# Altium PCB ublox_gnss_node.PcbDoc (part 4 of 5)
Units mm, origin at the board's own origin, x right, y up, seen from the top; angles counter-clockwise.
Board outline 84 x 108.04 mm, 6 copper layers (Top Layer (HSig), L2 GND, L3 Signal X, L4 PWR, L5 GND, Bottom Layer (Y)), stack 1.538 mm thick; 222 components, 159 nets, 892 pads, 1025 vias.
Unrouted connection lines stored in the file: 345.
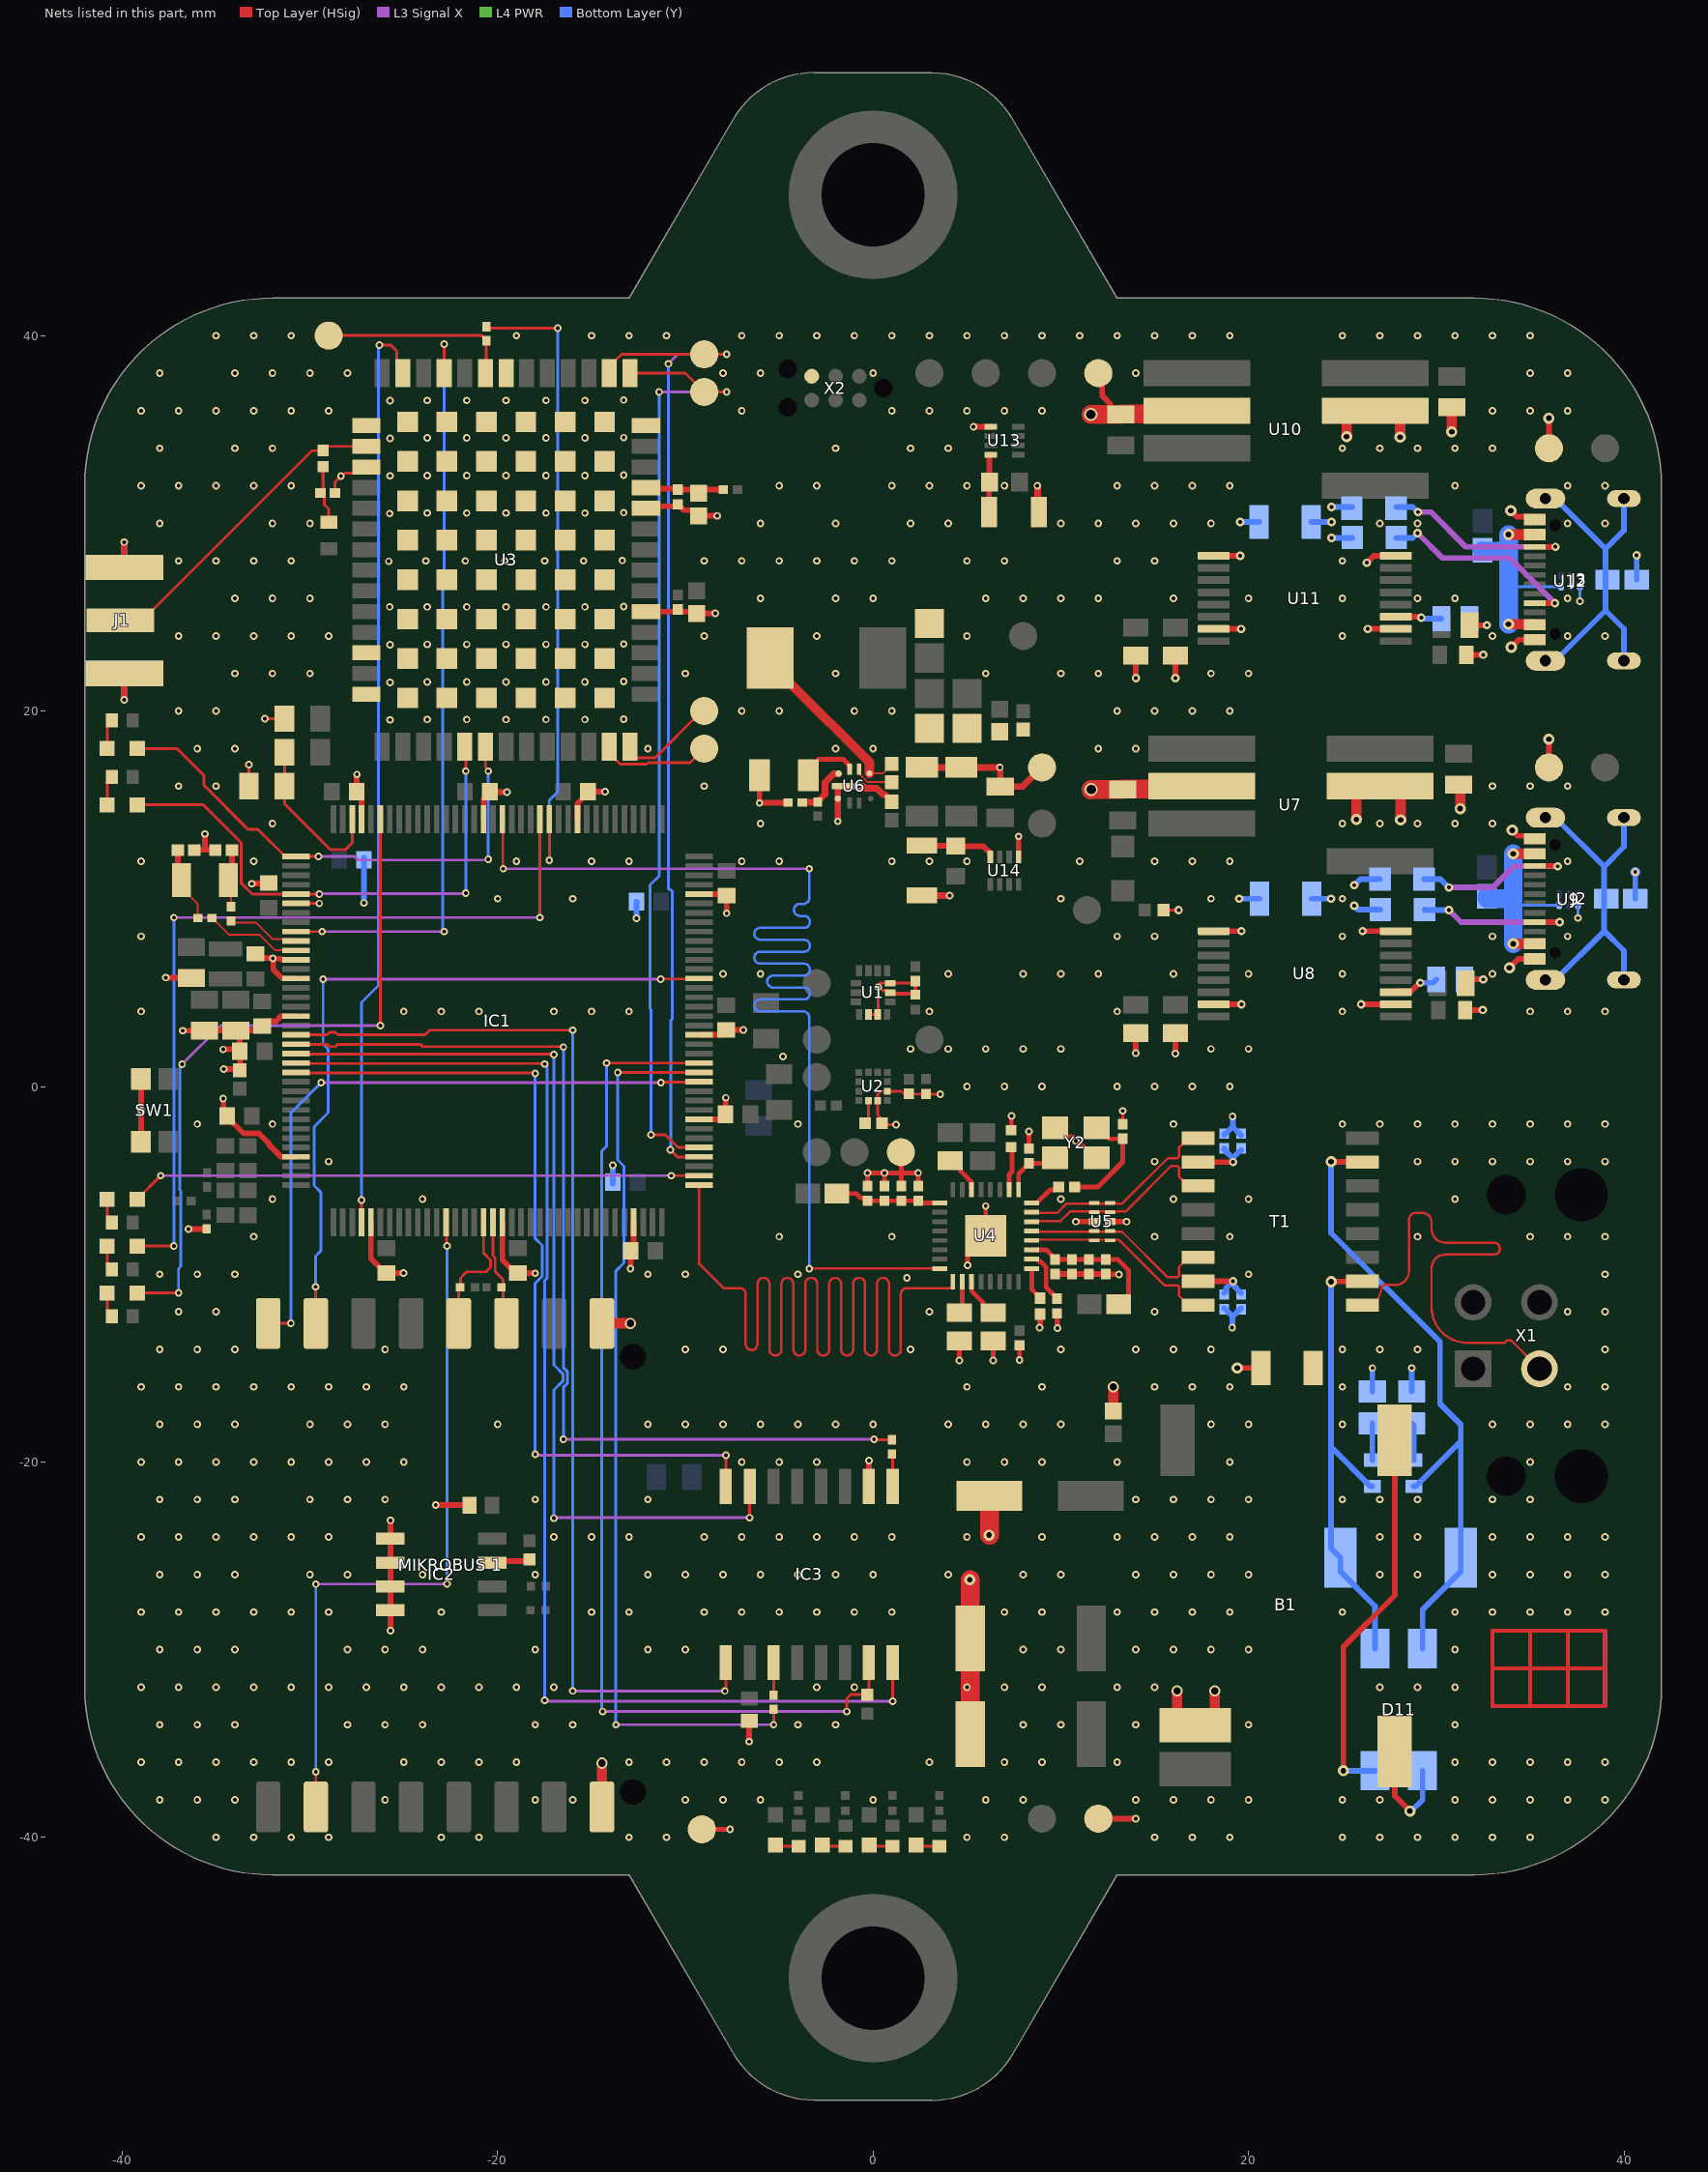
[diagram p7: the nets of this part, all layers, seen from the top]

## Via types
v1: diameter 0.4, hole 0.2, Top Layer (HSig) to Bottom Layer (Y), tented both sides, 916 vias
v2: diameter 0.45, hole 0.2, Top Layer (HSig) to Bottom Layer (Y), tented both sides, 53 vias
v3: diameter 0.6, hole 0.3, Top Layer (HSig) to Bottom Layer (Y), tented both sides, 35 vias
v4: diameter 0.7, hole 0.5, Top Layer (HSig) to Bottom Layer (Y), tented both sides, 13 vias
v5: diameter 0.6, hole 0.4, Top Layer (HSig) to Bottom Layer (Y), tented both sides, 8 vias

## Nets (pads, with @x,y where several pads share a name; then routed paths per layer and width w, separated by ;. In a path a pad name is that pad's centre, name@x,y a point inside that pad or via, vN(x,y) a via of type N, cw(c..) or ccw(c..) an arc to the next point about the centre after c; other vN are vias at no path point) (continued)
ETH_TXD0: IC1.126 U4.24 | length 68.4
  Top Layer (HSig) w0.128: IC1.126@-19.75,14.238 -19.725,14.213 -19.725,11.625 v1(-19.699,11.599) ; v1(-3.399,-9.701) U4.24@3.548,-9.701
  L3 Signal X w0.117: v1(-19.699,11.599) v1(-3.399,11.599)
  Bottom Layer (Y) w0.128: v1(-3.399,-9.701) -3.399,3.617 -3.399,3.681 ccw(c-3.718,3.681) -3.718,3.999 -6.009,3.999 cw(c-6.009,4.317) -6.009,4.635 -3.68,4.635 ccw(c-3.68,4.954) -3.68,5.272 -5.318,5.272 cw(c-5.318,5.59) -5.318,5.908 -3.68,5.908 ccw(c-3.68,6.226) -3.68,6.544 -6.009,6.544 cw(c-6.009,6.862) -6.009,7.18 -3.68,7.18 ccw(c-3.68,7.498) -3.68,7.816 -6.009,7.816 cw(c-6.009,8.134) -6.009,8.452 -3.68,8.452 ccw(c-3.68,8.77) -3.68,9.088 -3.898,9.088 cw(c-3.898,9.406) -3.898,9.724 -3.718,9.724 ccw(c-3.718,10.042) -3.399,10.042 -3.399,11.071 v1(-3.399,11.599)
ETH_TXD1: IC1.73 U4.25 | length 70.9
  Top Layer (HSig) w0.128: IC1.73@-9.262,-5.25 -9.262,-9.45 -7.969,-10.744 -7.609,-10.744 -7.109,-10.744 cw(c-7.109,-11.062) -6.791,-11.062 -6.791,-13.722 ccw(c-6.473,-13.722) -6.154,-13.722 -6.154,-10.513 cw(c-5.836,-10.513) -5.518,-10.513 -5.518,-14.012 ccw(c-5.2,-14.012) -4.882,-14.012 -4.882,-10.513 cw(c-4.564,-10.513) -4.246,-10.513 -4.246,-14.012 ccw(c-3.928,-14.012) -3.61,-14.012 -3.61,-10.513 cw(c-3.292,-10.513) -2.974,-10.513 -2.974,-14.012 ccw(c-2.656,-14.012) -2.338,-14.012 -2.338,-10.513 cw(c-2.02,-10.513) -1.702,-10.513 -1.702,-14.012 ccw(c-1.384,-14.012) -1.066,-14.012 -1.066,-10.513 cw(c-0.748,-10.513) -0.43,-10.513 -0.43,-14.012 ccw(c-0.112,-14.012) 0.206,-14.012 0.206,-10.513 cw(c0.525,-10.513) 0.843,-10.513 0.843,-14.012 ccw(c1.161,-14.012) 1.479,-14.012 1.479,-11.062 cw(c1.797,-11.062) 1.797,-10.744 1.861,-10.744 4.186,-10.744 4.186,-10.725 4.248,-10.662 U4.25@4.248,-10.401
GEOFENCE_STAT: D4.1 IC1.5 U3.19 | length 28.6
  Top Layer (HSig) w0.15: D4.1@-39.2,15 -35.673,15 -33.655,12.982 -33.655,10.825 -33.075,10.245 -30.743,10.245 IC1.5@-30.738,10.25 v1(-29.5,10.25) ; U3.19@-21.75,18.1 -21.7,18.05 v1(-21.7,16.8)
  L3 Signal X w0.15: v1(-29.5,10.25) -29.475,10.275 -21.725,10.275 v1(-21.7,10.3)
  Bottom Layer (Y) w0.15: v1(-21.7,10.3) v1(-21.7,16.8)
GND: "MIKROBUS 1.8" "MIKROBUS 1.9" *14.1 *15.1 *16.1 *17.1 *18.1 B1.2 C1.1 C2.1 C3.1 C4.1 C5.1 C7.1 C8.1 C9.1 C14.1 C15.1 C16.1 C17.1 C18.1 C19.1 C20.1 C21.1 C22.1 C23.1 C24.1 C25.1 C26.2 C27.1 C28.1 C29.1 C30.1 C31.1 C32.1 C33.1 C34.2 C35.2 C36.1 C37.1 C38.1 C39.1 C40.1 C41.1 C42.1 C43.1 C44.1 C45.1 C46.1 C47.1 C48.1 C49.1 C50.1 C53.1 C54.1 C56.1 C57.1 C58.1 C59.2 C60.1 C61.1 C62.1 C63.1 C64.1 C65.1 C67.1 C71.2 C72.2 C73.1 C75.1 C79.2 C80.2 C81.1 C82.2 C83.2 C84.2 C85.1 C86.1 C87.1 C88.1 IC1.6 IC1.12 IC1.14 IC1.18 IC1.33 IC1.41 IC1.55 IC1.69 IC1.80 IC1.89 IC1.104 IC1.118 IC1.128 IC1.141 IC2.1 IC2.2 IC2.3 IC2.4 IC3.10 J1.2 J1.3 J1.4 J1.5 R14.2 R15.2 R18.1 R29.1 R30.1 R33.1 R34.1 R39.1 R41.1 R52.1 R53.1 R56.2 R57.2 SW1.2 SW1.4 U1.2 U1.3 U1.6 U1.7 U2.6 U2.8 U3.1 U3.3 U3.12 U3.14 U3.32 U3.37 U3.41 U3.48 U3.55 U4.33 U5.3 U5.8 U6.1 U6.9 U7.6 U8.9 U8.15 U10.6 U11.9 U11.15 U13.1 U14.1 X2.5 Y2.2 Y2.4 | length 207.1
  Top Layer (HSig) w0.15: R14.2@-33.25,16 v1(-33.25,17.15) ; v1(-32.4,19.6) R15.2@-31.35,19.6 ; IC1.6@-30.738,9.75 v1(-29.5,9.75) ; U1.2@-0.25,3.838 U1.3@0.25,3.838 0.262,3.85 0.262,5.177 0.272,5.186 0.275,5.186 v1@0.169,5.292 ; C5.1@0.483,-1.956 C5.1@0.485,-1.956 ; U1.6@0.913,5 0.813,5.1 0.535,5.1 0.343,5.292 v1@0.169,5.292 ; U1.7@0.917,5.505 U1.7@0.913,5.5 ; v1(1.219,-2.032) 0.72,-2.032 0.485,-1.797 0.485,-1.75 0.25,-1.515 U2.6@0.25,-0.763 0.25,-0.425 0.425,-0.25 U2.8@0.763,-0.25 1.51,-0.25 1.66,-0.4 2.5,-0.4 2.506,-0.406 v1(3.581,-0.406) ; C2.1@2.435,5.425 C2.1@2.25,5.61 2.14,5.5 U1.7@0.913,5.5 ; C48.1@13.3,-2.01 v1(13.3,-1.3) ; R41.1@15.4,9.4 v2(16.275,9.4) ; v1@0.169,5.292 0.376,5.5 U1.7@0.913,5.5
  Top Layer (HSig) w0.155: C7.1@-28.66,31.625 -28.66,32.215 v1(-28.35,32.525) -28.284,32.525 -28.131,32.677 -27.323,32.677 U3.3@-27,33
  Top Layer (HSig) w0.2: U1.6@0.913,5 0.962,4.95 2.2,4.95 C1.1@2.25,4.9 C2.1@2.25,5.61
  Top Layer (HSig) w0.25: -14.309,-38.519 -14.448,-38.38 -14.448,-38.963 -13.924,-39.487 ; *17.1@-8.864,-39.573 v1(-7.619,-39.573) ; C43.1@-0.3,-5.31 v1(-0.3,-4.6) v1(0.6,-4.6) ; C42.1@0.6,-5.31 v1(0.6,-4.6) ; C41.1@1.5,-5.31 1.5,-4.6 ; *14.1@1.5,-3.5 1.5,-4.6 ; C40.1@2.4,-5.31 v1(2.4,-4.6) 1.5,-4.6 ; v1(4.6,-14.6) R29.1@4.6,-13.55 ; v1(5.03,-9.53) 5.03,-8.919 U4.33@5.999,-7.95 5.996,-7.948 v1(5.996,-6.369) ; v1(6.4,-14.6) R30.1@6.4,-13.55 ; R34.1@7.35,-2.325 7.362,-2.313 7.362,-1.588 v1(7.375,-1.575) ; v1(7.8,-14.575) C53.1@7.8,-13.79 ; C49.1@8.3,-3.31 v1(8.3,-2.4) ; Y2.2@9.7,-2.2 10.175,-2.675 10.675,-2.675 10.675,-2.734 10.8,-2.859 v1(10.8,-2.9) ; v1@10.9,-2.9 11.8,-3.8 Y2.4@11.9,-3.8 ; v1(0.6,-4.6) 1.5,-4.6
  Top Layer (HSig) w0.3: v1(-39.9,20.6) J1.3@-39.9,22 ; J1.2@-39.9,27.65 v1(-39.9,29) ; SW1.4@-39,-2.95 SW1.2@-39,0.4 ; v1(-37.675,5.8) C27.1@-36.305,5.8 ; v1(-36.775,2.975) -35.58,2.975 -35.575,2.98 C33.1@-33.95,2.98 ; v1(-36.475,-7.6) -36.463,-7.588 -35.512,-7.588 R18.1@-35.5,-7.575 ; C35.2@-36.16,12.6 -35.6,12.6 ; v1(-35.6,13.45) -35.6,12.6 ; C34.2@-35.04,12.6 -35.6,12.6 ; v1(-34.625,-0.65) -34.606,-0.669 -34.606,-1.379 C23.1@-34.41,-1.575 ; v1(-34.625,1.975) C24.1@-33.735,1.975 ; v1(-34.592,0.926) C31.1@-33.727,0.926 ; C23.1@-34.41,-1.63 -33.54,-2.5 -32.726,-2.5 -32.186,-3.041 -32.186,-3.109 -31.545,-3.75 IC1.33@-30.738,-3.75 ; C31.1@-33.7,0.965 -33.718,0.982 -33.718,1.957 C24.1@-33.735,1.975 ; v1(-33.1,10.8) -33.082,10.818 -32.217,10.818 C14.1@-32.2,10.835 ; C26.2@-32.9,7.07 -32.674,6.844 -31.994,6.844 v1(-31.975,6.825) v1@-31.956,6.806 ; C25.1@-32.45,3.215 -32.45,3.285 -32.255,3.48 -31.815,3.48 -31.545,3.75 IC1.18@-30.738,3.75 ; C25.1@-32.345,2.98 C33.1@-33.95,2.98 ; IC1.14@-30.738,5.75 -31.479,5.75 -31.956,6.227 v1@-31.956,6.806 ; IC1.12@-30.738,6.75 -31.479,6.75 -31.535,6.806 v1@-31.956,6.806 ; v1(-27.5,16.625) -27.507,16.618 -27.507,15.707 C86.1@-27.515,15.7 -27.25,15.435 IC1.141@-27.25,14.238 ; IC1.41@-26.75,-7.238 -26.75,-9.165 -25.98,-9.935 C22.1@-25.925,-9.935 v1(-25.01,-9.935) ; v1(-25.712,-28.988) IC2.4@-25.712,-27.905 IC2.3@-25.712,-26.635 IC2.2@-25.712,-25.365 IC2.1@-25.712,-24.095 v1(-25.712,-23.112) ; v1(-23.3,-22.3) C82.2@-21.5,-22.3 ; IC1.128@-20.75,14.238 -20.75,15.31 -20.49,15.57 -20.49,15.7 -20.465,15.675 v1(-19.5,15.675) ; IC1.55@-19.75,-7.238 -19.75,-9.24 -19.005,-9.985 C21.1@-18.95,-9.985 ; C21.1@-18.925,-9.935 -18.918,-9.942 -18.008,-9.942 v1(-18,-9.95) ; IC1.118@-15.75,14.238 -15.75,15.085 -15.19,15.645 C17.1@-15.19,15.7 v1(-14.275,15.7) ; v1(-12.925,-9.7) -12.918,-9.693 -12.918,-8.757 -12.75,-8.59 IC1.69@-12.75,-7.238 ; U3.32@-12.1,25.3 -9.501,25.3 C8.1@-9.4,25.199 v1(-8.4,25.2) ; U3.37@-12.1,30.8 -11.995,30.905 -10.505,30.905 C88.1@-10.4,31.01 -10.4,30.99 -10.29,30.88 -10.27,30.88 -10.092,30.702 -9.603,30.702 C63.1@-9.3,30.399 v1(-8.301,30.399) ; IC1.80@-9.262,-1.75 -8.235,-1.75 -8.23,-1.745 -8.175,-1.745 -7.91,-1.48 -7.91,-1.425 -7.854,-1.369 -7.854,-0.606 v1(-7.848,-0.6) ; IC1.89@-9.262,2.75 -8.075,2.75 C19.1@-7.825,3 ; IC1.104@-9.262,10.25 -7.885,10.25 C18.1@-7.8,10.165 v1(-7.8,9.225) ; C19.1@-7.825,3.015 v1(-6.915,3.015) ; v1(-6.6,-34.9) C83.2@-6.6,-33.8 ; C65.1@-6.05,16.575 v1(-6.05,15.1) -6.038,15.112 -4.537,15.112 R39.1@-4.525,15.125 ; IC3.10@-0.225,-21.31 v1(-0.225,-19.925) ; v1(5.35,35.15) U13.1@6.26,35.15 ; U14.1@7.75,12.24 v1(7.75,13.325) ; v1(8.875,-12.85) 8.887,-12.838 8.887,-12.138 R33.1@8.9,-12.125 ; C36.1@9.7,-9.99 C37.1@10.6,-9.99 C38.1@11.5,-9.99 C39.1@12.4,-9.99 12.413,-10.003 13.087,-10.003 v1(13.1,-10.017) ; C50.1@9.8,-12.09 9.813,-12.102 9.813,-12.863 v1(9.825,-12.875) ; v1(10.8,-7.2) U5.3@11.782,-7.2 ; *16.1@12,-39 v1(14,-39) ; *18.1@12,38 12.2,37.8 12.2,36.8 12.63,36.37 12.63,36.13 12.96,35.8 C75.1@13.2,35.8 ; U5.8@12.617,-7.2 v1(13.5,-7.2) ; v1(14,1.775) C72.2@14,2.85 ; v2(14,21.75) C80.2@14,22.95 ; v1(16.1,1.75) C71.2@16.1,2.85 ; v2(16.1,21.75) C79.2@16.1,22.95 ; B1.2@16.16,-34.035 16.84,-34.035 16.94,-34.035 B1.2@17.15,-34.035 ; U8.15@18.15,4.375 v2(19.625,4.375) ; U8.9@18.15,8.275 v2(19.625,8.275) ; U11.15@18.15,24.375 v2(19.6,24.375) v2@19.625,24.375 ; U11.9@18.15,28.275 v2(19.55,28.275) ; v3(19.4,-15) C54.1@20.66,-15 ; C33.1@-33.95,2.98 -33.735,2.765 C24.1@-33.735,1.975
  Top Layer (HSig) w0.35: R39.1@-4.575,15.075 R39.1@-4.537,15.112 ; v1(-1.877,14.123) U6.1@-1.877,15.339 -1.877,16 U6.9@-1.55,16 v1(-0.734,16) -0.725,15.99 -0.531,15.99 -0.426,15.885 0.196,15.885 0.526,15.555 0.63,15.555 1,15.185 C59.2@1,15.165 ; C58.1@2.41,17.19 C58.1@2.6,17 v1(6.75,17) ; R57.2@2.6,10.175 v1(4.075,10.175) ; v1@6.75,17.014 v1(6.75,17) ; C64.1@7.95,19.06 C64.1@8,19.01 ; v1(8.75,32) 8.76,31.99 8.76,30.665 R56.2@8.825,30.6 ; *15.1@9,17 7.98,15.98 C56.1@6.775,15.98 6.775,16.961 6.75,16.986 v1(6.75,17)
  Top Layer (HSig) w0.55: -14.448,-38.38 v5(-14.448,-36.048) ; -14.448,-12.62 v5(-12.92,-12.62) ; C85.1@12.8,-17.299 v5(12.8,-16) ; v5(16.2,-32.2) 16.2,-33.395 B1.2@16.84,-34.035 ; B1.2@16.3,-33.395 B1.2@16.94,-34.035 ; B1.2@17.15,-34.035 17.56,-34.035 18.2,-33.395 v5(18.2,-32.2)
  Top Layer (HSig) w1: R53.1@5.175,-34.5 R52.1@5.175,-29.4 v3@5.175,-26.275 ; v3@6.2,-23.9 C84.2@6.2,-21.8 ; v4@11.6,15.8 v4(11.62,15.82) C67.1@13.3,15.82 13.32,15.84 17.34,15.84 U7.6@17.5,16 ; v4(11.6,35.8) C75.1@12.96,35.8 ; C75.1@13.2,35.8 13.22,35.82 17.07,35.82 U10.6@17.25,36
  Bottom Layer (Y) w0.3: v1(-39.9,20.6) J1.5@-39.9,22 ; J1.4@-39.9,27.65 v1(-39.9,29) ; v1(-27.125,9.775) -27.12,9.78 -27.12,12.17 C28.1@-27.115,12.175 ; C30.1@-13.86,-5.175 v1(-13.86,-4.19) ; v1(-12.61,8.96) C29.1@-12.61,9.85 ; C46.1@18.7,-11.835 C46.1@18.7,-11.815 ; C46.1@18.7,-11.81 19.15,-12.26 ; C44.1@18.7,-2.59 19.15,-2.14 ; C44.1@18.7,-2.56 C44.1@18.7,-2.54 ; v1(19.125,-12.85) 19.144,-12.831 19.144,-12.266 C47.1@19.6,-11.81 ; v1(19.15,-1.6) 19.169,-1.619 19.169,-2.159 19.6,-2.59 C45.1@19.6,-2.61 ; v2(19.5,10) C73.1@20.585,10 ; v2(19.55,30.075) C81.1@20.56,30.075
  other v1: -35,-40 -33,-40 -31,-40 -29,-40 -23,-40 -21,-40 -13,-40 -11,-40 5,-40 7,-40 15,-40 17,-40 19,-40 -38,-38 -36,-38 -34,-38 -26,-38 -18,-38 -16,-38 -10,-38 -8,-38 -6,-38 0,-38 6,-38 8,-38 14,-38 16,-38 18,-38 20,-38 -39,-36 -37,-36 -35,-36 -33,-36 -31,-36 -29,-36 -25,-36 -23,-36 -21,-36 -19,-36 -13,-36 -11,-36 -9,-36 -7,-36 -5,-36 -3,-36 3,-36 7,-36 9,-36 13,-36 -38,-34 -36,-34 -34,-34 -28,-34 -26,-34 -24,-34 -18,-34 -16,-34 -4,-34 -2,-34 8,-34 10,-34 14,-34 20,-34 -39,-32 -37,-32 -35,-32 -33,-32 -31,-32 -29,-32 -27,-32 -25,-32 -23,-32 -21,-32 -19,-32 -17,-32 -3,-32 -1,-32 5,-32 7,-32 9,-32 13,-32 15,-32 -38,-30 -36,-30 -34,-30 -28,-30 -26,-30 -24,-30 -18,-30 -12,-30 -10,-30 8,-30 10,-30 14,-30 16,-30 18,-30 20,-30 -39,-28 -37,-28 -35,-28 -33,-28 -31,-28 -29,-28 -23,-28 -15,-28 -13,-28 -9,-28 -7,-28 -5,-28 -3,-28 -1,-28 1,-28 7,-28 9,-28 13,-28 15,-28 17,-28 19,-28 -38,-26 -36,-26 -34,-26 -30,-26 -28,-26 -24,-26 -18,-26 -12,-26 -10,-26 -8,-26 -6,-26 -4,-26 -2,-26 0,-26 4,-26 8,-26 10,-26 14,-26 16,-26 18,-26 20,-26 -39,-24 -37,-24 -35,-24 -33,-24 -31,-24 -29,-24 -17,-24 -15,-24 -13,-24 -9,-24 -7,-24 -5,-24 -3,-24 -1,-24 1,-24 5,-24 9,-24 13,-24 15,-24 17,-24 19,-24 -38,-22 -36,-22 -34,-22 -30,-22 -28,-22 -26,-22 -18,-22 -12,-22 14,-22 16,-22 18,-22 20,-22 -39,-20 -37,-20 -35,-20 -33,-20 -31,-20 -29,-20 -27,-20 -25,-20 -7,-20 -5,-20 -3,-20 5,-20 7,-20 9,-20 13,-20 19,-20 -38,-18 -36,-18 -34,-18 -30,-18 -28,-18 -26,-18 -20,-18 -12,-18 -10,-18 -8,-18 -6,-18 -4,-18 -2,-18 0,-18 4,-18 6,-18 8,-18 10,-18 18,-18 20,-18 -39,-16 -37,-16 -35,-16 -33,-16 -31,-16 -29,-16 -27,-16 -25,-16 5,-16 9,-16 15,-16 17,-16 19,-16 -38,-14 -36,-14 -34,-14 -26,-14 -10,-14 -8,-14 2,-14 10,-14 14,-14 16,-14 18,-14 -37,-12 -35,-12 3,-12 15,-12 1.8,-10.2 -38,-10 -36,-10 -34,-10 -12,-10 -10,-10 -4,-10 20,-10 -33,-8 -5,-8 1,-8 15,-8 19,-8 -32,-6 -24,-6 10,-6 16,-6 20,-6 -29,-4 15,-4 -36,-2 -32,-2 -4,-2 16,-2 -39,-1.275 5,0 7,0 9,0 13,0 15,0 17,0 19,0 -4.8,1.6 2,2 4,2 6,2 8,2 10,2 18,2 20,2 -39,4 -25,4 -23,4 -21,4 -17,4 -15,4 -13,4 3,4 13,4 0.275,5.292 -8,6 -6,6 4,6 8,6 10,6 12,6 16,6 20,6 -39,8 13,8 15,8 -20,10 -16,10 10,10 18,10 -39,12 -33,12 -19,12 -15,12 -13,12 -7,12 -5,12 1,12 3,12 5,12 11,12 15,12 17,12 19,12 -32,14 -6,14 -37,16 -35,16 -9,16 -36,18 -34,18 -12,18 -2,18 0,18 12,18 14,18 -25.729,19.53 -23.75,19.55 -21.65,19.55 -19.55,19.55 -17.425,19.55 -15.35,19.55 -13.286,19.57 -37,20 -35,20 -7,20 -5,20 -1,20 1,20 13,20 15,20 17,20 19,20 -25.729,21.53 -23.75,21.55 -21.65,21.55 -19.55,21.55 -17.425,21.55 -15.35,21.55 -13.286,21.57 -34,22 -32,22 -30,22 -10,22 -2,22 6,22 10,22 12,22 18,22 20,22 -25.729,23.53 -23.75,23.55 -21.65,23.55 -19.55,23.55 -17.425,23.55 -15.35,23.55 -13.286,23.57 -37,24 -35,24 -33,24 -31,24 -29,24 -9,24 -3,24 5,24 -25.75,25.55 -23.75,25.55 -21.65,25.55 -19.55,25.55 -17.425,25.55 -15.35,25.55 -13.286,25.57 -34,26 -32,26 -30,26 -6,26 -2,26 0,26 6,26 8,26 10,26 12,26 16,26 20,26 -25.804,27.98 -37,28 -35,28 -33,28 -31,28 -23.825,28 -21.725,28 -19.625,28 -17.5,28 -15.425,28 -13.361,28.02 -9,28 -7,28 -5,28 -3,28 -1,28 1,28 5,28 7,28 13,28 15,28 -38,30 -32,30 -30,30 -6,30 -2,30 2,30 4,30 10,30 12,30 14,30 16,30 18,30 -25.75,30.525 -23.75,30.55 -21.65,30.55 -19.55,30.55 -17.425,30.55 -15.35,30.55 -13.286,30.57 -39,32 -37,32 -35,32 -33,32 -31,32 -5,32 -3,32 1,32 3,32 5,32 7,32 13,32 15,32 17,32 19,32 -25.729,32.53 -23.75,32.55 -21.65,32.55 -19.55,32.55 -17.425,32.55 -15.35,32.55 -13.286,32.57 -38,34 -34,34 -32,34 -2,34 2,34 4,34 -25.729,34.53 -23.75,34.55 -21.65,34.55 -19.55,34.55 -17.425,34.55 -15.35,34.55 -13.286,34.57 -39,36 -37,36 -35,36 -33,36 -31,36 -29,36 -7,36 1,36 3,36 5,36 7,36 9,36 -25.729,36.53 -23.75,36.55 -21.65,36.55 -19.55,36.55 -17.425,36.55 -15.35,36.55 -13.286,36.57 -38,38 -34,38 -32,38 -30,38 -28,38 -8,38 -6,38 0,38 14,38 -35,40 -33,40 -31,40 -19,40 -15,40 -13,40 -11,40 -7,40 -5,40 -3,40 -1,40 1,40 3,40 5,40 7,40 9,40 11,40 13,40 15,40 17,40 19,40
  other v3: 5.15,-26.275 6.175,-23.9
GND_BP: *21.1 C66.1 C68.1 C69.2 C70.2 C73.2 FB4.2 J2.A1_B12 J2.B1_A12 R42.1 R43.1 U7.2 U8.2 U8.8 U9.4 | length 24
  Top Layer (HSig) w0.3: v2(26,4.375) U8.2@27.85,4.375 ; v2(26.075,8.275) U8.8@27.85,8.275 ; C68.1@31.46,4.075 v2(32.475,4.075) ; C69.2@31.575,5.5 31.775,5.7 v2(32.5,5.7) ; v3(33.9,6.325) 34.375,6.8 J2.A1_B12@35.25,6.8 ; v3(34.05,13.65) 34.35,13.35 35.1,13.35 J2.B1_A12@35.25,13.2 ; *21.1@36,17 v3(36,18.5)
  Top Layer (HSig) w0.55: v3(25.75,14.225) 25.75,15.577 26.173,16 U7.2@27,16 27.677,16 28.1,15.577 v3(28.1,14.2) ; v3(31.275,14.8) C66.1@31.275,16.105
  Bottom Layer (Y) w0.15: v2(32.5,5.7) v2@32.5,5.781 ; v1(37.55,8.975) U9.4@37.55,9.65
  Bottom Layer (Y) w0.3: C73.2@23.365,10 v2(24.4,10) ; v2(25.625,9.625) 25.825,9.425 R42.1@27.025,9.425 ; v2(25.625,10.725) 25.95,11.05 R43.1@27,11.05 ; C70.2@31.5,5.7 v2(32.5,5.7) ; FB4.2@40.601,10 v2(40.6,11.425)
  Bottom Layer (Y) w0.55: v2(40.6,11.425) v2(40.6,11.425)
  other v1: 25,4 35,4 37,4 39,4 25,6 33,6 25,8 33,8 37,8 25,10 37,12 25,14 27,14 29,14 31,14 33,14 33,16 35,16 37,16
GND_BP2: *24.1 C74.1 C76.1 C77.2 C78.2 C81.2 FB6.2 J3.A1_B12 J3.B1_A12 R46.1 R47.1 U10.2 U11.2 U11.8 U12.4 | length 19.9
  Top Layer (HSig) w0.3: v2(26.3,27.9) 26.675,28.275 U11.8@27.85,28.275 ; v2(26.35,24.375) U11.2@27.85,24.375 ; C76.1@31.61,23 v2(32.5,23) ; C77.2@31.775,24.575 v2(32.7,24.575) ; v3(33.975,30.675) 34.3,30.35 35.1,30.35 J3.B1_A12@35.25,30.2 ; v3(34,23.4) 34.4,23.8 J3.A1_B12@35.25,23.8 ; *24.1@36,34 v3(36,35.6)
  Top Layer (HSig) w0.55: v3(25.225,34.62) U10.2@25.225,35.925 ; v3(28.075,34.595) U10.2@28.075,35.9 ; v3(30.825,34.875) C74.1@30.825,36.18
  Bottom Layer (Y) w0.15: v1(37.65,25.85) U12.4@37.65,26.625
  Bottom Layer (Y) w0.3: C81.2@23.34,30.075 v2(24.425,30.075) ; v2(24.425,29.225) R46.1@25.525,29.225 ; v2(24.425,30.875) R47.1@25.525,30.875 ; C78.2@31.775,24.925 31.775,24.9 32.1,24.575 v2(32.7,24.575) ; FB6.2@40.676,27 v2@40.676,28.301
  other v1: 25,24 33,24 37,24 39,24 25,26 29,26 31,26 37,26 25,28 27,30 29,30 37,30 39,30 31,32 37,32 39,32 25,34 27,34 29,34 31,34 33,34 33,36 35,36 37,36 35,38 37,38 25,40 27,40 29,40 31,40 33,40 35,40
  other v2: 40.674,28.301
GND_ETH: C54.2 R36.1 R37.1 | length 2.5
  Bottom Layer (Y) w0.3: R36.1@26.6,-16.25 v1(26.6,-15) ; R37.1@28.7,-16.25 v1(28.7,-15)
  other v1: 25,-40 27,-40 29,-40 31,-40 33,-40 35,-40 25,-38 27,-38 31,-38 33,-38 35,-38 37,-38 39,-38 31,-36 33,-36 35,-36 37,-36 39,-36 31,-34 27,-32 29,-32 31,-32 31,-30 25,-28 31,-28 33,-28 35,-28 37,-28 39,-28 27,-26 29,-26 33,-26 35,-26 37,-26 39,-26 27,-24 29,-24 33,-24 35,-24 37,-24 39,-24 25,-22 27,-22 29,-22 33,-22 35,-22 35,-20 25,-18 33,-18 35,-18 37,-18 39,-18 25,-16 37,-16 39,-16 25,-14 27,-14 29,-14 39,-14 37,-12 39,-12 39,-10 29,-8 35,-8 37,-8 39,-8 31,-6 29,-4 31,-4 33,-4 35,-4 37,-4 39,-4 25,-2 27,-2 29,-2 31,-2 33,-2 35,-2 37,-2 39,-2
GNSS_EXTINT: IC1.9 U3.51 | length 40.7
  Top Layer (HSig) w0.15: IC1.9@-30.738,8.25 v1(-29.35,8.25) ; U3.51@-22.85,38 v1(-22.85,39.55)
  L3 Signal X w0.15: v1(-29.35,8.25) v1(-22.85,8.25)
  Bottom Layer (Y) w0.15: -22.925,27.476 -22.925,8.393 -22.85,8.318 v1(-22.85,8.25) ; -22.85,27.551 v1(-22.85,39.55)
GNSS_RESET_N: IC1.121 R2.1 | length 34.6
  Top Layer (HSig) w0.15: R2.1@-20.6,40.475 -20.525,40.4 v1(-16.8,40.4) ; v1(-17.25,12.05) IC1.121@-17.25,14.238
  Bottom Layer (Y) w0.15: v1(-17.25,12.05) -17.25,15.245 -16.8,15.695 v1(-16.8,40.4)
GNSS_RTK_STAT: D2.1 IC1.1 U3.20 | length 27.5
  Top Layer (HSig) w0.15: D2.1@-39.2,18 -37.076,18 -35.638,16.562 -35.638,16.038 -33.288,13.688 -32.763,13.688 -31.326,12.25 IC1.1@-30.738,12.25 v1(-29.55,12.25) ; U3.20@-20.65,18.1 -20.65,17.018 -20.5,16.868 v1(-20.5,16.8)
  L3 Signal X w0.15: v1(-29.55,12.25) -27.626,12.25 -27.439,12.062 -20.538,12.062 v1(-20.5,12.1)
  Bottom Layer (Y) w0.15: v1(-20.5,12.1) v1(-20.5,16.8)
GNSS_TIMEPULSE: IC1.40 U3.53 | length 49.5
  Top Layer (HSig) w0.15: IC1.40@-27.25,-7.238 v1(-27.25,-6.05) ; v1(-26.3,39.5) -25.7,39.5 -25.375,39.175 -25.375,38.325 U3.53@-25.05,38
  Bottom Layer (Y) w0.15: v1(-27.25,-6.05) -27.25,4.486 -26.35,5.386 -26.35,39.45 v1(-26.3,39.5)
GNSS_UART1_RX: *10.1 IC1.76 U3.43 | length 53.9
  Top Layer (HSig) w0.15: U3.43@-14.05,38 -14.05,38.35 -13.4,39 *10.1@-9,39 v1(-7.8,39) ; v1(-10.8,-3.375) -10.425,-3.75 IC1.76@-9.262,-3.75
  L3 Signal X w0.15: v1(-10.9,38.5) -10.4,39 v1(-7.8,39)
  Bottom Layer (Y) w0.15: v1(-10.9,38.5) -10.9,10.495 -10.803,10.495 -10.7,10.392 -10.7,3.593 -10.779,3.514 -10.779,-3.354 v1(-10.8,-3.375)
GNSS_UART1_TX: *11.1 IC1.77 U3.42 | length 51.8
  Top Layer (HSig) w0.15: U3.42@-12.95,38 -10,38 *11.1@-9,37 v1(-7.8,37) ; v1(-11.825,-2.575) -11.07,-2.575 -10.395,-3.25 IC1.77@-9.262,-3.25
  L3 Signal X w0.15: v1(-11.4,37) v1(-7.8,37)
  Bottom Layer (Y) w0.15: v1(-11.825,-2.575) -11.825,4.087 -11.88,4.142 -11.88,10.736 -11.4,11.216 v1(-11.4,37)
GNSS_UART2_RX: *8.1 U3.26 | length 6
  Top Layer (HSig) w0.15: U3.26@-14.05,18.1 -14.05,17.75 -13.475,17.175 -12.055,17.175 -11.98,17.25 -9.75,17.25 *8.1@-9,18
GNSS_UART2_TX: *7.1 U3.27 | length 5.4
  Top Layer (HSig) w0.15: U3.27@-12.95,18.1 -12.95,17.75 -12.7,17.5 -11.625,17.5 -9.125,20 *7.1@-9,20
I2C_SCL: "MIKROBUS 1.12" IC1.53 R23.1 | length 6.8
  Top Layer (HSig) w0.15: -22.068,-12.62 -22.068,-10.868 -21.975,-10.775 -21.975,-10.2 -21.65,-9.875 -20.625,-9.875 -20.385,-9.635 -20.385,-9.236 -20.75,-8.871 IC1.53@-20.75,-7.238
I2C_SDA: "MIKROBUS 1.11" IC1.54 R21.1 | length 5.9
  Top Layer (HSig) w0.15: IC1.54@-20.25,-7.238 -20.25,-9.018 -20.135,-9.133 -20.135,-9.857 -19.7,-10.292 -19.7,-12.448 -19.528,-12.62 ; R21.1@-19.8,-10.7 R21.1@-19.678,-10.578
INT: "MIKROBUS 1.15" IC1.95 | length 39.1
  Top Layer (HSig) w0.15: v1(-29.7,-10.675) -29.7,-12.608 -29.688,-12.62 ; v1(-11.312,5.712) -11.293,5.731 -9.281,5.731 IC1.95@-9.262,5.75
  L3 Signal X w0.15: v1(-29.301,5.712) v1(-11.312,5.712)
  Bottom Layer (Y) w0.15: v1(-29.7,-10.675) -29.7,-9.038 -29.425,-8.763 -29.425,-5.629 -29.775,-5.279 -29.775,-2.145 -29.025,-1.395 -29.025,1.987 -29.301,2.262 v1(-29.301,5.712)
M1:  | length 38
  Top Layer (HSig) w0.2: 33,-31 33,-29 35,-29 ; 33,-31 35,-31 ; 33,-31 33,-33 35,-33 ; 35,-33 35,-31 ; 35,-33 37,-33 ; 35,-33 37,-33 ; 35,-31 35,-29 ; 35,-31 37,-31 ; 35,-31 37,-31 ; 35,-29 37,-29 ; 37,-33 37,-31 ; 37,-33 39,-33 39,-31 ; 37,-31 37,-29 ; 37,-31 39,-31 ; 37,-29 39,-29 39,-31
M2: 
M3:  | length 38
  L3 Signal X w0.2: 33,-31 35,-31 ; 33,-31 33,-33 35,-33 ; 33,-31 33,-29 35,-29 ; 35,-33 35,-31 ; 35,-33 37,-33 ; 35,-33 37,-33 ; 35,-31 37,-31 ; 35,-31 35,-29 ; 35,-31 37,-31 ; 35,-29 37,-29 ; 37,-33 37,-31 ; 37,-33 39,-33 39,-31 ; 37,-31 37,-29 ; 37,-31 39,-31 ; 37,-29 39,-29 39,-31
M4:  | length 38
  L4 PWR w0.2: 33,-31 35,-31 ; 33,-31 33,-33 35,-33 ; 33,-31 33,-29 35,-29 ; 35,-33 35,-31 ; 35,-33 37,-33 ; 35,-33 37,-33 ; 35,-31 37,-31 ; 35,-31 35,-29 ; 35,-31 37,-31 ; 35,-29 37,-29 ; 37,-33 37,-31 ; 37,-33 39,-33 39,-31 ; 37,-31 37,-29 ; 37,-31 39,-31 ; 37,-29 39,-29 39,-31
M5: 
M6:  | length 38
  Bottom Layer (Y) w0.2: 33,-31 35,-31 ; 33,-31 33,-33 35,-33 ; 33,-31 33,-29 35,-29 ; 35,-33 37,-33 ; 35,-33 37,-33 ; 35,-33 35,-31 ; 35,-31 37,-31 ; 35,-31 37,-31 ; 35,-31 35,-29 ; 35,-29 37,-29 ; 37,-33 37,-31 ; 37,-33 39,-33 39,-31 ; 37,-31 39,-31 ; 37,-31 37,-29 ; 37,-29 39,-29 39,-31
MB_PWM: "MIKROBUS 1.16" IC1.84 | length 34.9
  Top Layer (HSig) w0.15: -32.228,-12.62 v1(-31.02,-12.62) ; v1(-11.3,0.2) -11.275,0.225 -9.287,0.225 IC1.84@-9.262,0.25
  L3 Signal X w0.15: v1(-29.4,0.2) v1(-11.3,0.2)
  Bottom Layer (Y) w0.15: v1(-31.02,-12.62) -31.02,-1.42 v1(-29.4,0.2)
MB_RST: "MIKROBUS 1.2" IC1.49 | length 38.1
  Top Layer (HSig) w0.15: -29.688,-38.38 v1(-29.688,-36.512) ; IC1.49@-22.75,-7.238 -22.725,-7.263 -22.725,-8.475 v1(-22.7,-8.5)
  L3 Signal X w0.15: v1(-29.688,-26.512) -29.682,-26.506 -22.706,-26.506 v1(-22.7,-26.5)
  Bottom Layer (Y) w0.15: v1(-29.688,-36.512) v1(-29.688,-26.512) ; v1(-22.7,-26.5) v1(-22.7,-8.5)
MCU_LED_Green: D8.1 IC1.122 | length 44.2
  Top Layer (HSig) w0.15: D8.1@-39.2,-8.5 v1(-37.25,-8.5) ; v1(-17.75,9) IC1.122@-17.75,14.238
  L3 Signal X w0.15: v1(-37.25,9) v1(-17.75,9)
  Bottom Layer (Y) w0.15: v1(-37.25,-8.5) v1(-37.25,9)
MCU_LED_Red: D7.1 IC1.74 | length 30.5
  Top Layer (HSig) w0.15: D7.1@-39.2,-6 v1(-37.95,-4.75) ; v1(-10.75,-4.75) IC1.74@-9.262,-4.75
  L3 Signal X w0.15: v1(-37.95,-4.75) v1(-10.75,-4.75)
MCU_LED_Yellow: D9.1 IC1.139 | length 36.9
  Top Layer (HSig) w0.15: D9.1@-39.2,-11 v1(-37,-11) ; v1(-26.25,3.25) IC1.139@-26.25,14.238
  L3 Signal X w0.15: v1(-36.813,1.187) -34.75,3.25 v1(-26.25,3.25)
  Bottom Layer (Y) w0.15: v1(-37,-11) -37,-9.701 -36.875,-9.576 -36.875,-5.555 -36.925,-5.505 -36.925,1.007 -36.813,1.119 v1(-36.813,1.187)
NetB1_4: B1.4 D11.1 | length 6
  Top Layer (HSig) w0.3: B1.4@27.79,-35.435 27.79,-37.79 v3(28.6,-38.6)
  Bottom Layer (Y) w0.3: v3(28.6,-38.6) 28.667,-38.6 29.27,-37.997 D11.1@29.27,-36.45
NetB1_5: B1.5 D11.2 | length 20.4
  Top Layer (HSig) w0.3: v3(25.05,-36.45) 25.05,-29.854 27.79,-27.114 B1.5@27.79,-18.845
  Bottom Layer (Y) w0.3: v3(25.05,-36.45) D11.2@26.73,-36.45
NetC5_2: C5.2 U2.5 | length 1.3
  Top Layer (HSig) w0.15: C5.2@-0.435,-1.956 -0.25,-1.771 U2.5@-0.25,-0.763
NetC7_2: C7.2 L1.1 R3.1 | length 3.2
  Top Layer (HSig) w0.155: L1.1@-29.3,33.021 -29.3,31.765 C7.2@-29.44,31.625 -29.42,31.625 -29.238,31.442 -29.238,31.001 -29,30.764 R3.1@-29,30.05
NetC34_1: C34.1 R22.2 Y1.1 | length 3.1
  Top Layer (HSig) w0.1: Y1.1@-34.35,11 -34.2,10.85 R22.2@-34.2,9.675
  Top Layer (HSig) w0.3: Y1.1@-34.35,11 -34.16,11.19 C34.1@-34.16,12.6
NetC35_1: C35.1 R27.2 Y1.2 | length 4.1
  Top Layer (HSig) w0.1: Y1.2@-36.85,11 -36.85,10.6 -35.975,9.725 R27.2@-35.975,8.975
  Top Layer (HSig) w0.3: C35.1@-37.04,12.6 -37.04,11.19 Y1.2@-36.85,11
NetC36_2: C36.2 C37.2 C38.2 C39.2 FB1.1 U4.3 | length 7.7
  Top Layer (HSig) w0.25: U4.3@8.45,-8.7 9.21,-8.7 9.7,-9.19 C36.2@9.7,-9.21 C37.2@10.6,-9.21 C38.2@11.5,-9.21 C39.2@12.4,-9.21 13.035,-9.21 13.6,-9.775 13.6,-11.196 13.196,-11.6 FB1.1@13.076,-11.6
NetC40_2: C40.2 C41.2 C42.2 C43.2 FB2.1 U4.17 | length 5.7
  Top Layer (HSig) w0.25: FB2.1@-1.924,-5.7 -0.896,-5.7 -0.661,-5.935 -0.435,-5.935 -0.3,-6.07 C43.2@-0.3,-6.09 C42.2@0.6,-6.09 C41.2@1.5,-6.09 C40.2@2.4,-6.09 2.508,-6.198 3.546,-6.198 U4.17@3.548,-6.2
NetC44_2: C44.2 C45.2 T1.2 | length 3.7
  Top Layer (HSig) w0.3: T1.2@17.325,-4.025 v2(19.175,-4.025)
  Bottom Layer (Y) w0.3: C44.2@18.7,-3.36 18.825,-3.485 19.146,-3.806 19.146,-3.996 v2(19.175,-4.025) 19.204,-3.996 19.204,-3.756 19.55,-3.41 19.6,-3.41 C45.2@19.6,-3.39 ; C44.2@18.7,-3.34 C44.2@18.81,-3.45 ; C44.2@18.7,-3.31 C44.2@18.7,-3.29
NetC46_2: C46.2 C47.2 T1.7 | length 3.5
  Top Layer (HSig) w0.3: T1.7@17.325,-10.375 v2(19.175,-10.375)
  Bottom Layer (Y) w0.3: C46.2@18.7,-11.01 18.81,-10.9 18.81,-10.74 v2(19.175,-10.375) 19.204,-10.404 19.204,-10.594 19.6,-10.99 C47.2@19.6,-11.01
NetC48_2: C48.2 R32.2 Y2.1 | length 6
  Top Layer (HSig) w0.25: R32.2@10.737,-5.359 11.959,-5.359 13.3,-4.018 C48.2@13.3,-2.79 12.59,-2.79 12,-2.2 Y2.1@11.9,-2.2
NetC49_2: C49.2 U4.9 Y2.3 | length 3.2
  Top Layer (HSig) w0.25: U4.9@7.749,-5.499 7.749,-4.661 8.3,-4.11 C49.2@8.3,-4.09 9.41,-4.09 Y2.3@9.7,-3.8
NetC50_2: C50.2 U4.2 | length 2.9
  Top Layer (HSig) w0.25: U4.2@8.45,-9.2 8.729,-9.2 8.853,-9.324 8.925,-9.324 9.215,-9.614 9.215,-10.697 9.4,-10.882 9.4,-10.89 9.8,-11.29 C50.2@9.8,-11.31
NetC51_2: C51.2 R36.2 | length 2
  Bottom Layer (Y) w0.3: C51.2@26.6,-19.9 R36.2@26.6,-17.95
NetC52_2: C52.2 R37.2 | length 2
  Bottom Layer (Y) w0.3: R37.2@28.7,-17.95 28.8,-18.05 C52.2@28.8,-19.9
NetC55_1: C55.1 L3.1 U6.5 | length 9.8
  Top Layer (HSig) w0.1: U6.5@-0.195,16.68 0.51,16.68 C55.1@1,17.17
  Top Layer (HSig) w0.5: L3.1@-5.475,22.825 -5.475,22.45 -4.475,21.45 -4.38,21.45 -0.195,17.265 U6.5@-0.195,16.68 ; C55.1@1,17.17 C55.1@1,17.19
NetC55_2: C55.2 U6.6 | length 2.2
  Top Layer (HSig) w0.1: U6.6@-0.75,16.9 -0.675,16.825 -0.675,16.594 -0.291,16.21 C55.2@1,16.21
NetC63_2: C63.2 C88.2 R44.1 U3.38 | length 4.3
  Top Layer (HSig) w0.3: U3.38@-12.1,31.9 -12.045,31.845 -10.455,31.845 C88.2@-10.4,31.79 -9.489,31.79 C63.2@-9.3,31.601 -9.101,31.8 R44.1@-7.975,31.8
NetC65_2: C65.2 U6.7 | length 3.1
  Top Layer (HSig) w0.25: C65.2@-3.45,16.575 -3.45,16.875 -2.9,17.425 -1.582,17.425 -1.4,17.243 -1.4,17.225 -1.25,17.075 U6.7@-1.25,16.9
NetC70_1: C70.1 U8.3 | length 2.4
  Top Layer (HSig) w0.3: U8.3@27.85,5.025 27.905,5.08 28.664,5.08 29.109,5.525 v2(29.15,5.525)
  Bottom Layer (Y) w0.3: v2(29.15,5.525) 29.825,5.525 C70.1@30,5.7
NetC78_1: C78.1 U11.3 | length 2.5
  Top Layer (HSig) w0.3: U11.3@27.85,25.025 29.109,25.025 29.159,24.975 v2(29.2,24.975)
  Bottom Layer (Y) w0.3: v2(29.2,24.975) 29.241,24.975 29.291,24.925 C78.1@30.275,24.925
NetD1_2: D1.2 R4.1 | length 1.3
  Top Layer (HSig) w0.15: D1.2@-0.2,-40.4 -0.125,-40.475 R4.1@1.025,-40.475
NetD2_2: D2.2 R5.1 | length 1.6
  Top Layer (HSig) w0.15: D2.2@-40.8,18 -40.8,18.762 -40.8,19.25 R5.1@-40.55,19.5
NetD3_2: D3.2 R6.1 | length 1.3
  Top Layer (HSig) w0.15: D3.2@2.3,-40.4 2.375,-40.475 R6.1@3.525,-40.475
NetD4_2: D4.2 R7.1 | length 1.6
  Top Layer (HSig) w0.15: D4.2@-40.8,15 -40.8,15.762 -40.8,16.25 R7.1@-40.55,16.5
NetD5_2: D5.2 R8.1 | length 1.3
  Top Layer (HSig) w0.15: D5.2@-5.2,-40.4 -5.125,-40.475 R8.1@-3.975,-40.475
NetD6_2: D6.2 R9.1 | length 1.3
  Top Layer (HSig) w0.15: D6.2@-2.7,-40.4 -2.625,-40.475 R9.1@-1.475,-40.475
NetD7_2: D7.2 R10.1 | length 1.4
  Top Layer (HSig) w0.15: D7.2@-40.8,-6 -40.8,-6.95 -40.55,-7.2 R10.1@-40.55,-7.25
NetD8_2: D8.2 R11.1 | length 1.4
  Top Layer (HSig) w0.15: D8.2@-40.8,-8.5 -40.8,-9.45 -40.55,-9.7 R11.1@-40.55,-9.75
NetD9_2: D9.2 R12.1 | length 1.4
  Top Layer (HSig) w0.15: D9.2@-40.8,-11 -40.8,-11.95 -40.55,-12.2 R12.1@-40.55,-12.25
NetFB3_1: FB3.1 J2.A4_B9 J2.B4_A9 U9.6 | length 11.2
  Top Layer (HSig) w0.55: v3(34.1,7.6) J2.A4_B9@35.25,7.6 ; v3(34.1,12.4) J2.B4_A9@35.25,12.4
  Bottom Layer (Y) w0.15: 34.1,10 34.45,9.65 U9.6@36.55,9.65
  Bottom Layer (Y) w1: FB3.1@32.7,10.124 32.7,10.029 32.729,10 34.1,10 ; v3(34.1,7.6) 34.1,10 ; v3(34.1,12.4) 34.1,10
NetFB4_1: FB4.1 J2.SH1 J2.SH2 J2.SH3 J2.SH4 | length 17.9
  Bottom Layer (Y) w0.3: J2.SH1@35.82,5.68 36.345,5.68 38.949,8.284 ; J2.SH2@35.82,14.32 36.345,14.32 38.949,11.716 ; J2.SH3@40,5.68 40,7.233 38.949,8.284 ; J2.SH4@40,14.32 40,12.767 38.949,11.716 ; 38.949,8.284 38.949,10 38.949,11.716
NetFB5_1: FB5.1 J3.A4_B9 J3.B4_A9 U12.6 | length 12
  Top Layer (HSig) w0.55: v3(33.85,24.625) 33.855,24.62 35.23,24.62 J3.A4_B9@35.25,24.6 ; v3(33.85,29.4) J3.B4_A9@35.25,29.4
  Bottom Layer (Y) w0.15: FB5.1@32.324,28.725 FB5.1@32.475,28.574 ; 33.85,26.575 33.9,26.625 U12.6@36.65,26.625
  Bottom Layer (Y) w1: FB5.1@32.475,28.554 32.504,28.525 33.85,28.525 ; v3(33.85,24.625) 33.85,26.575 33.85,28.525 ; v3(33.85,29.4) 33.85,28.525
NetFB6_1: FB6.1 J3.SH1 J3.SH2 J3.SH3 J3.SH4 | length 18.1
  Bottom Layer (Y) w0.3: J3.SH1@35.82,22.68 36.345,22.68 39.024,25.359 ; J3.SH2@35.82,31.32 36.345,31.32 39.024,28.641 ; J3.SH3@40,22.68 40,24.383 39.024,25.359 ; J3.SH4@40,31.32 40,29.617 39.024,28.641 ; 39.024,25.359 39.024,27 39.024,28.641
NetIC2_7: IC2.7 R48.1 | length 2.2
  Top Layer (HSig) w0.1: R48.1@-18.465,-25.365 -18.382,-25.282 R48.1@-18.3,-25.2
  Top Layer (HSig) w0.3: IC2.7@-20.288,-25.365 -20.205,-25.282 R48.1@-18.382,-25.282
NetIC3_3: IC3.3 R50.2 | length 1.7
  Top Layer (HSig) w0.15: IC3.3@-5.305,-30.69 -5.3,-30.695 R50.2@-5.3,-32.425
NetIC3_9: IC3.9 R51.1 | length 1.8
  Top Layer (HSig) w0.15: R51.1@1,-19.575 1.045,-19.62 IC3.9@1.045,-21.31
NetJ2_A5: J2.A5 R42.2 | length 8.8
  Top Layer (HSig) w0.3: J2.A5@35.25,8.75 v2(36.575,8.75)
  L3 Signal X w0.3: v2(30.675,9.4) 31.325,8.75 v2(36.575,8.75)
  Bottom Layer (Y) w0.3: R42.2@29.375,9.425 29.4,9.4 v2(30.675,9.4)
NetJ2_B5: J2.B5 R43.2 | length 9
  Top Layer (HSig) w0.3: J2.B5@35.25,11.75 36.45,11.75 v2(36.475,11.725)
  L3 Signal X w0.3: v2(30.675,10.6) 33.012,10.6 34.137,11.725 v2(36.475,11.725)
  Bottom Layer (Y) w0.3: R43.2@29.35,11.05 30.225,11.05 v2(30.675,10.6)
NetJ3_A5: J3.A5 R46.2 | length 11.2
  Top Layer (HSig) w0.3: J3.A5@35.25,25.75 v2(36.325,25.75)
  L3 Signal X w0.3: v2(29,29.475) 30.325,28.15 33.925,28.15 v2(36.325,25.75)
  Bottom Layer (Y) w0.3: R46.2@27.875,29.225 28.75,29.225 v2(29,29.475)
NetJ3_B5: J3.B5 R47.2 | length 10.5
  Top Layer (HSig) w0.3: J3.B5@35.25,28.75 v2(36.35,28.75)
  L3 Signal X w0.3: v2(29.025,30.6) 29.722,30.6 31.572,28.75 v2(36.35,28.75)
  Bottom Layer (Y) w0.3: R47.2@27.875,30.875 28.75,30.875 v2(29.025,30.6)
NetR2_2: R2.2 r.1 U3.49 | length 10.3
  Top Layer (HSig) w0.15: r.1@-29,40 -20.85,40 -20.6,39.75 R2.2@-20.6,39.725 -20.6,38.05 U3.49@-20.65,38
NetR29_2: R29.2 U4.26 | length 1.7
  Top Layer (HSig) w0.25: R29.2@4.6,-12.05 4.749,-11.901 U4.26@4.749,-10.401
NetR30_2: R30.2 U4.27 | length 2.2
  Top Layer (HSig) w0.25: U4.27@5.249,-10.401 5.251,-10.403 5.251,-10.901 5.85,-11.5 5.85,-11.675 6.225,-12.05 R30.2@6.4,-12.05
NetR31_2: R31.2 U4.14 | length 2.1
  Top Layer (HSig) w0.25: R31.2@4.1,-3.95 4.275,-3.95 4.65,-4.325 4.65,-4.5 5.247,-5.097 5.247,-5.497 U4.14@5.249,-5.499
NetR32_1: R32.1 U4.8 | length 1.8
  Top Layer (HSig) w0.25: U4.8@8.45,-6.2 8.729,-6.2 9.42,-5.509 9.737,-5.509 R32.1@9.887,-5.359
NetR33_2: R33.2 U4.1 | length 1.8
  Top Layer (HSig) w0.25: U4.1@8.45,-9.701 8.45,-10.8 8.9,-11.25 R33.2@8.9,-11.275
NetR34_2: R34.2 U4.10 | length 2.4
  Top Layer (HSig) w0.25: U4.10@7.251,-5.497 U4.10@7.249,-5.499 7.249,-4.7 7.4,-4.549 7.4,-3.275 R34.2@7.35,-3.225
NetR38_1: R38.1 R39.2 U6.8 | length 3
  Top Layer (HSig) w0.35: R39.2@-3.775,15.125 -3.762,15.137 -2.963,15.137 R38.1@-2.95,15.15 -2.95,15.175 -2.561,15.564 -2.561,16.203 -2.098,16.665 U6.8@-1.841,16.665
NetR54_2: R54.2 R56.1 U13.4 | length 3.1
  Top Layer (HSig) w0.3: R56.1@6.175,30.6 6.175,32.175 R54.2@6.2,32.2 6.2,33.65 U13.4@6.26,33.65
NetR55_2: R55.2 R57.1 U14.4 | length 4
  Top Layer (HSig) w0.3: R57.1@2.6,12.825 4.375,12.825 R55.2@4.4,12.8 5.875,12.8 6.25,12.425 U14.4@6.25,12.24
PC14: IC1.10 R22.1 | length 4
  Top Layer (HSig) w0.1: R22.1@-34.2,8.925 -34.2,8.9 -34.025,8.725 -32.857,8.725 -31.982,7.85 -30.838,7.85 IC1.10@-30.738,7.75
PC15: IC1.11 R27.1 | length 5.2
  Top Layer (HSig) w0.1: R27.1@-35.225,8.975 -35.2,8.975 -34.3,8.075 -32.675,8.075 -31.85,7.25 IC1.11@-30.738,7.25
PDR-ON: IC1.142 R13.1 R14.1 | length 8.7
  Top Layer (HSig) w0.15: R13.1@-31.35,17.7 R14.1@-31.35,16 -31.35,15.05 -28.925,12.625 -28.095,12.625 -27.75,12.97 IC1.142@-27.75,14.238
PMD_RD_N: T1.8 U4.4 U5.5 U5.6 | length 10.7
  Top Layer (HSig) w0.124: U4.4@8.45,-8.2 8.488,-8.162 10.08,-8.162 11.745,-8.162 U5.5@11.782,-8.2 11.82,-8.162 12.58,-8.162 U5.6@12.617,-8.2 12.655,-8.162 13.086,-8.162 15.511,-10.587 16.215,-10.587 16.288,-10.66 16.288,-11.133 16.8,-11.645 T1.8@17.325,-11.645
PMD_RD_P: T1.6 U4.5 U5.4 U5.7 | length 10.7
  Top Layer (HSig) w0.124: U4.5@8.45,-7.7 8.488,-7.738 9.904,-7.738 11.489,-7.738 11.745,-7.738 U5.4@11.782,-7.7 11.82,-7.738 12.076,-7.738 12.324,-7.738 12.58,-7.738 U5.7@12.617,-7.7 12.655,-7.738 12.911,-7.738 13.262,-7.738 15.687,-10.163 16.215,-10.163 16.288,-10.09 16.288,-9.617 16.8,-9.105 T1.6@17.325,-9.105
PMD_TD_N: T1.3 U4.6 U5.2 U5.9 | length 10.9
  Top Layer (HSig) w0.124: U4.6@8.45,-7.2 8.488,-7.162 9.989,-7.162 10.489,-6.662 11.745,-6.662 U5.2@11.782,-6.7 11.82,-6.662 12.58,-6.662 U5.9@12.617,-6.7 12.655,-6.662 13.452,-6.662 15.877,-4.237 16.215,-4.237 16.288,-4.31 16.288,-4.783 16.8,-5.295 T1.3@17.325,-5.295
PMD_TD_P: T1.1 U4.7 U5.1 U5.10 | length 10.9
  Top Layer (HSig) w0.124: U4.7@8.45,-6.7 8.488,-6.738 9.813,-6.738 10.313,-6.238 11.489,-6.238 11.745,-6.238 U5.1@11.782,-6.2 11.82,-6.238 12.076,-6.238 12.324,-6.238 12.58,-6.238 U5.10@12.617,-6.2 12.655,-6.238 12.911,-6.238 13.277,-6.238 15.702,-3.813 16.215,-3.813 16.288,-3.74 16.288,-3.267 16.8,-2.755 T1.1@17.325,-2.755
POE_RX: C51.1 D10.2 D11.3 T1.10 | length 25.3
  Top Layer (HSig) w0.3: v3(24.4,-10.4) 24.412,-10.388 26.063,-10.388 T1.10@26.075,-10.375
  Bottom Layer (Y) w0.3: v3(24.4,-10.4) 24.4,-19.2 ; C51.1@26.6,-21.3 26.5,-21.3 24.4,-19.2 ; D11.3@26.73,-29.95 26.73,-27.675 24.895,-25.84 D10.2@24.895,-25.1 24.4,-24.605 24.4,-19.2
POE_TX: C52.1 D10.1 D11.4 T1.15 | length 34.8
  Top Layer (HSig) w0.3: v3(24.4,-4) 24.412,-4.012 26.062,-4.012 T1.15@26.075,-4.025
  Bottom Layer (Y) w0.3: v3(24.4,-4) 24.4,-7.8 30.2,-13.6 30.2,-16.9 31.305,-18.005 31.305,-18.895 ; C52.1@28.8,-21.3 28.9,-21.3 31.305,-18.895 ; D11.4@29.27,-29.95 29.27,-27.875 31.305,-25.84 D10.1@31.305,-25.1 31.305,-18.895
QSPI_BK1_IO0: IC1.22 IC3.15 | length 51
  Top Layer (HSig) w0.15: IC1.22@-30.738,1.75 -30.713,1.725 -17.025,1.725 v1(-17,1.7) ; v1(-6.575,-22.975) IC3.15@-6.575,-21.31
  L3 Signal X w0.15: v1(-17,-23) -16.975,-22.975 v1(-6.575,-22.975)
  Bottom Layer (Y) w0.15: v1(-17,-23) -17,-16.172 -16.525,-15.697 -16.525,-15.303 -17,-14.828 v1(-17,1.7)
QSPI_BK1_IO1: IC1.23 IC3.8 | length 67.9
  Top Layer (HSig) w0.15: IC1.23@-30.738,1.25 -30.713,1.225 -17.525,1.225 v1(-17.5,1.2) ; v1(1.045,-32.745) IC3.8@1.045,-30.69
  L3 Signal X w0.15: v1(-17.5,-32.7) -17.455,-32.745 v1(1.045,-32.745)
  Bottom Layer (Y) w0.15: v1(-17.5,-32.7) -17.5,-10.334 -17.375,-10.209 -17.375,1.075 v1(-17.5,1.2)
QSPI_BK1_IO2: IC1.21 R51.2 | length 53
  Top Layer (HSig) w0.15: IC1.21@-30.738,2.25 -29.08,2.25 -28.955,2.125 -28.645,2.125 -28.52,2.25 -24.119,2.25 -23.994,2.125 -16.525,2.125 v1(-16.5,2.1) ; v1(0.05,-18.8) 0.075,-18.825 R51.2@1,-18.825
  L3 Signal X w0.15: v1(-16.5,-18.8) v1(0.05,-18.8)
  Bottom Layer (Y) w0.15: v1(-16.5,-18.8) -16.5,-16.025 -16.275,-15.8 -16.275,-15.2 -16.5,-14.975 v1(-16.5,2.1)
QSPI_BK1_IO3: IC1.20 IC3.1 | length 59.8
  Top Layer (HSig) w0.15: IC1.20@-30.738,2.75 -29.08,2.75 -28.955,2.875 -28.645,2.875 -28.52,2.75 -23.869,2.75 -23.619,3 v1(-16,3) ; v1(-7.9,-32.2) -7.845,-32.145 IC3.1@-7.845,-30.69
  L3 Signal X w0.15: v1(-16,-32.2) v1(-7.9,-32.2)
  Bottom Layer (Y) w0.15: v1(-16,-32.2) -16,-31.6 v1(-16,3)
QSPI_BK1_NCS: IC1.86 IC3.7 R49.1 | length 56.2
  Top Layer (HSig) w0.15: v1(-14.2,1.25) IC1.86@-9.262,1.25 ; v1(-1.4,-33.3) -1.4,-32.6 -1.2,-32.4 R49.1@-0.3,-32.4 -0.225,-32.325 IC3.7@-0.225,-30.69
  L3 Signal X w0.15: v1(-14.4,-33.3) v1(-1.4,-33.3)
  Bottom Layer (Y) w0.15: v1(-14.4,-33.3) -14.45,-33.25 -14.45,-3.434 -14.2,-3.184 v1(-14.2,1.25)
QSPI_CLK: IC1.24 IC3.16 | length 45.2
  Top Layer (HSig) w0.15: IC1.24@-30.738,0.75 -30.713,0.725 -18.025,0.725 v1(-18,0.7) ; IC3.16@-7.845,-21.31 v1(-7.845,-19.645)
  L3 Signal X w0.15: v1(-18,-19.6) -17.955,-19.645 v1(-7.845,-19.645)
  Bottom Layer (Y) w0.15: v1(-18,-19.6) -18,-10.48 -17.625,-10.105 -17.625,-8.47 -18,-8.095 v1(-18,0.7)
QSPI_RST: IC1.85 R50.1 | length 48.6
  Top Layer (HSig) w0.15: v1(-13.6,0.75) IC1.85@-9.262,0.75 ; v1(-5.3,-34) R50.1@-5.3,-33.175
  L3 Signal X w0.15: v1(-13.7,-34) v1(-5.3,-34)
  Bottom Layer (Y) w0.15: v1(-13.7,-34) -13.7,-9.825 -13.27,-9.395 -13.27,-4.25 -13.6,-3.92 v1(-13.6,0.75)
RF_IN: J1.1 L1.2 U3.2 | length 16.9
  Top Layer (HSig) w0.128: J1.1@-40.1,24.825 -38.935,24.825 -29.881,33.879 L1.2@-29.3,33.879 -29.079,34.1 U3.2@-27,34.1
RX_N: T1.9 X1.4 | length 26.3
  Top Layer (HSig) w0.124: T1.9@26.075,-11.645 26.888,-11.357 27.102,-10.781 ccw(c26.95,-10.725) 27.112,-10.725 27.112,-10.698 cw(c27.236,-10.698) 27.236,-10.574 27.8,-10.574 ccw(c27.8,-9.824) 28.55,-9.824 28.55,-7.1 cw(c28.925,-7.1) 28.925,-6.725 29.25,-6.725 cw(c29.25,-7.226) 29.751,-7.226 29.751,-7.307 29.751,-7.581 ccw(c30.491,-7.581) 30.491,-8.321 33.072,-8.321 cw(c33.072,-8.637) 33.072,-8.953 30.491,-8.953 ccw(c30.491,-9.693) 29.751,-9.693 29.751,-10.792 29.751,-11.75 ccw(c31.65,-11.75) 31.65,-13.649 33.651,-13.649 33.775,-13.525 33.989,-13.525 X1.4@35.5,-15.036